# Altium PCB Smart-Button-PCB-v2.1.PcbDoc (part 1 of 2)
Units mm, origin at the board's own origin, x right, y up, seen from the top; angles counter-clockwise.
Board outline 90 x 83 mm, 2 copper layers (Top Layer, Bottom Layer), stack 1.17 mm thick; 43 components, 20 nets, 162 pads, 0 vias.
Unrouted connection lines stored in the file: 71.
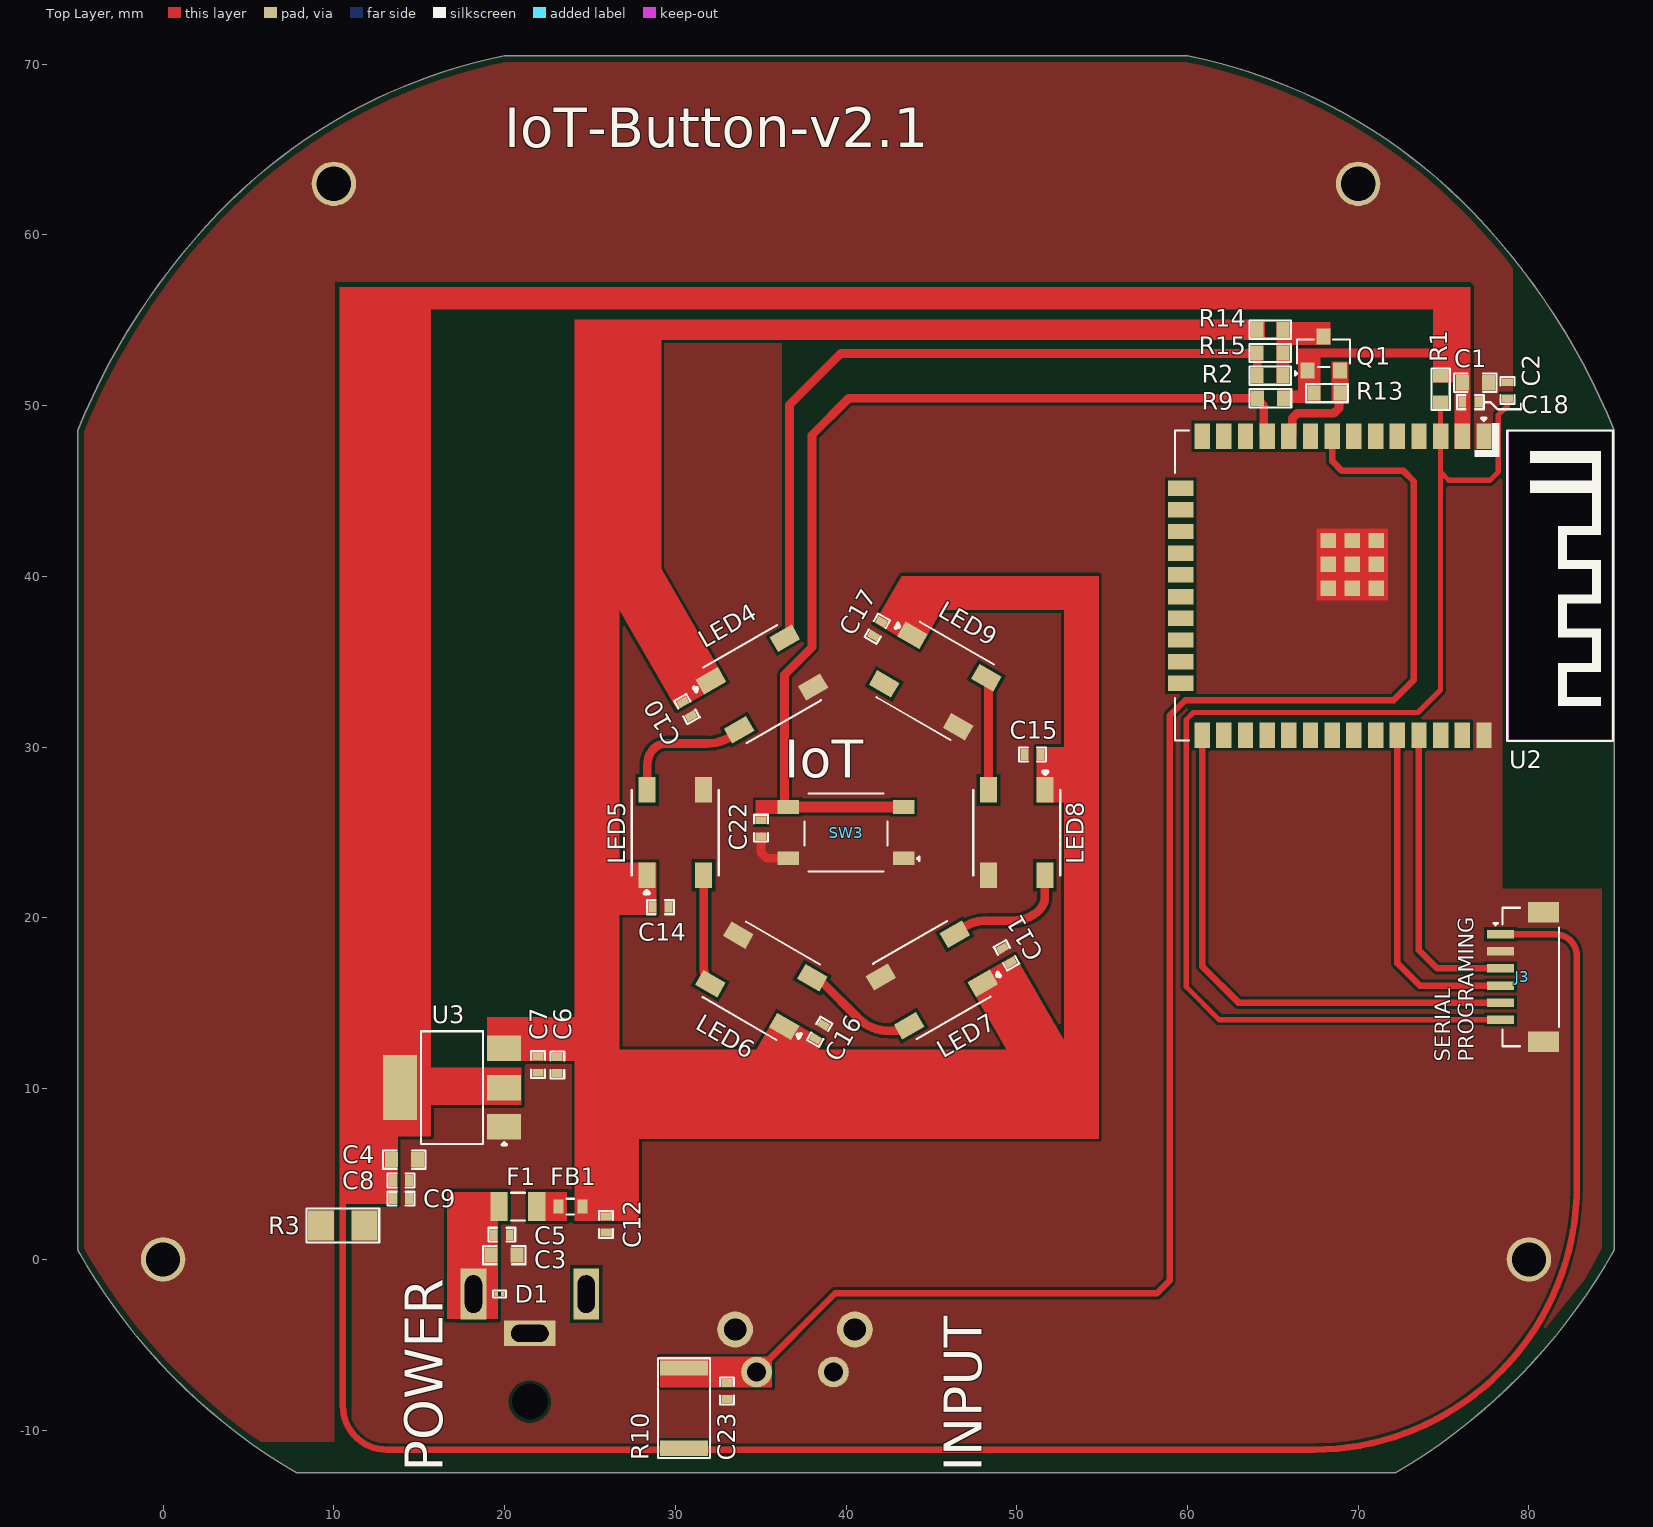
[diagram p0: Top Layer view]
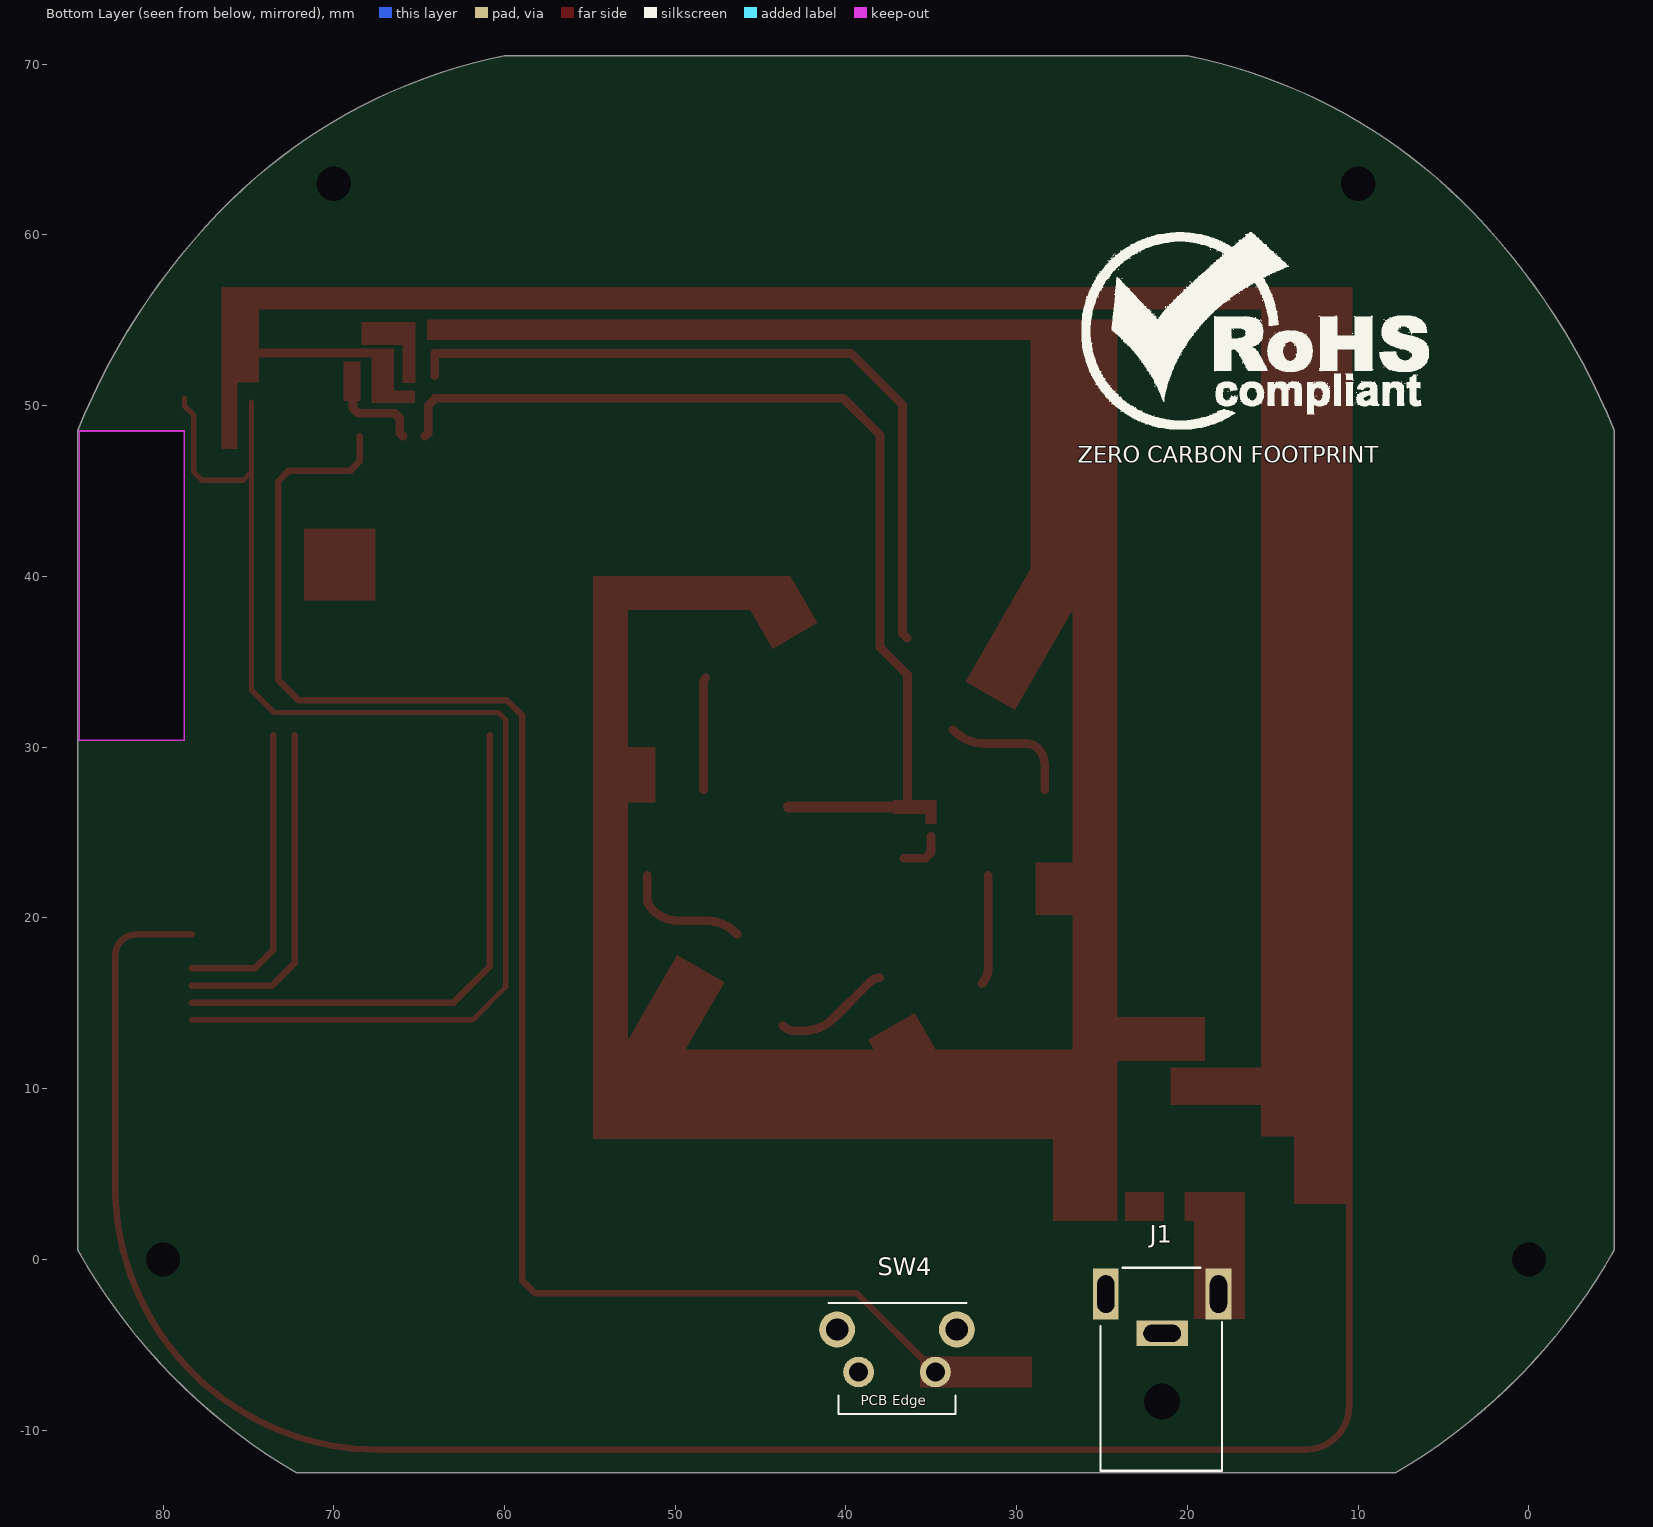
[diagram p1: Bottom Layer view, seen from below]
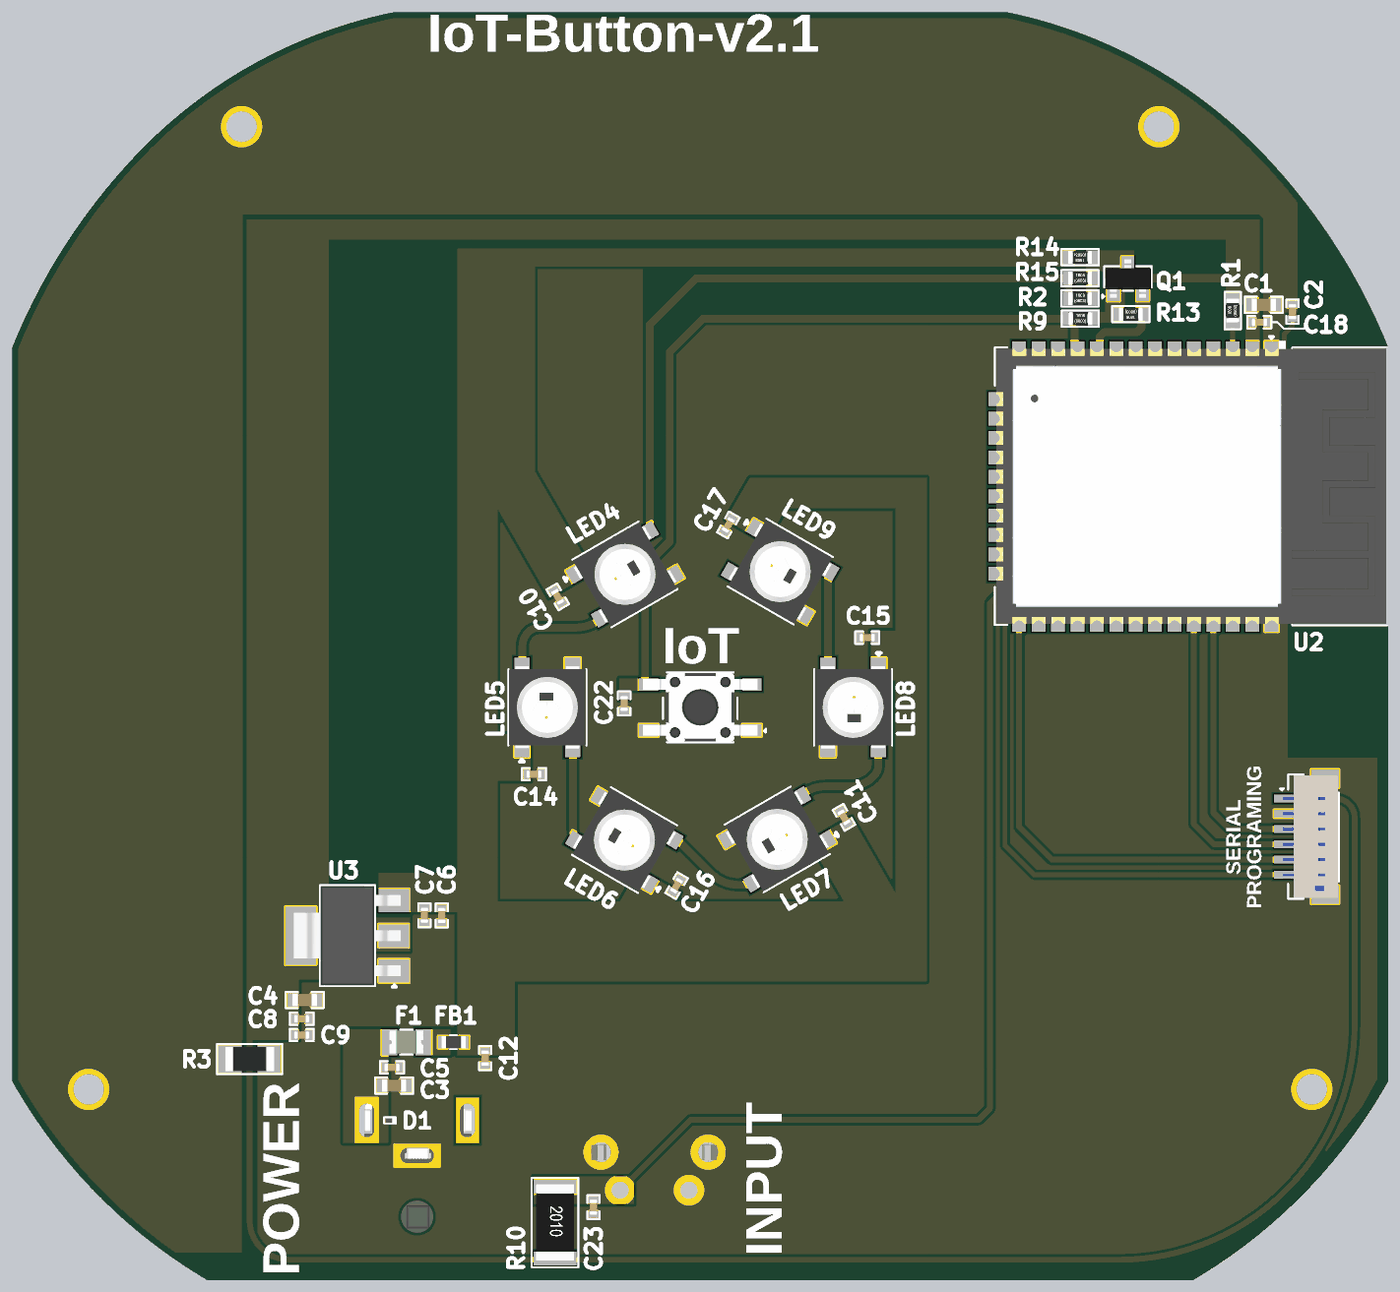
[diagram p2: 3D render of the assembled board from above, using the file's embedded part models]

## Layer stack, top to bottom
Top Solder: solder mask 0.01, Solder Resist, Dk 3.5
Top Layer: signal copper 0.035
Dielectric 1: dielectric 1.1, FR-4, Dk 4.8
Bottom Layer: signal copper 0.035
Bottom Solder: solder mask 0.01, Solder Resist, Dk 3.5

## Board outline
7.805,-12.5 cw(c25.512,17.69) -5,0.544 -5,48.544 cw(c32.1,33.591) 3.25,61.298 cw(c26.33,39.132) 20,70.5 60,70.5 cw(c53.67,39.132) 76.75,61.298 cw(c47.9,33.591) 85,48.544 85,0.544 cw(c54.488,17.69) 72.195,-12.5
cut-out: 78.74,30.397 78.74,48.533 85,48.544 85,30.411

## Design rules (kind name [scope] priority, off if disabled: settings)
BoardOutlineClearance [All] p1: gap=0 ignorepadtopadclearanceinfootprint=FALSE except(0.381: Poly-OutlineEdge)
Clearance [All] p1: gap=0.178 ignorepadtopadclearanceinfootprint=TRUE
HoleToHoleClearance [All] p1: gap=0.127 allowstackedmicrovias=TRUE
MinimumSolderMaskSliver [All] p1: minsoldermaskwidth=0
PolygonConnect [All] p1: connectstyle=Direct reliefconductorwidth=0.432 reliefentries=4 polygonreliefangle="90 Angle" airgapwidth=0.254
RoutingLayers [All] p1: top layer_v5=TRUE bottom layer_v5=FALSE
RoutingVias [All] p1: holewidth=0.3 width=0.6 viastyle="Through Hole" minholewidth=0.3 minwidth=0.6 maxholewidth=0.3 maxwidth=0.6
SilkToSilkClearance [All] p1: silktosilkclearance=0
SilkToSolderMaskClearance [IsPad] p1: minsilkscreentomaskgap=0 clearancetoexposedcopper=TRUE
SolderMaskExpansion [All] p1: expansion=0.102 istentingtop=FALSE
SupplyNets "Schematic Supply Nets_4" [InNet('D-GND')] p1: voltage=0.000
SupplyNets "Schematic Supply Nets_3" [InNet('5VIN')] p2: voltage=0.000
SupplyNets "Schematic Supply Nets_2" [InNet('3.3V')] p3: voltage=0.000
SupplyNets "Schematic Supply Nets_1" [InNet('5VCC')] p4: voltage=0.000
SupplyNets "Schematic Supply Nets" [InNet('GND')] p5: voltage=0.000
UnRoutedNet [All] p1: checkbadconnections=TRUE
Width [All] p1: maxlimit=1.2 minlimit=0.254 preferedwidth=0.508 minimp=50.000000 maximp=50.000000 favimp=50.000000
24 further rules are at their usual default settings.

## Classes and differential pairs
component class U_Power-Section: C3 C4 C5 C6 C7 C8 C9 C12 D1 F1 FB1 J1 U3
component class U_LEDS: C10 C11 C14 C15 C16 C17 LED4 LED5 LED6 LED7 LED8 LED9 Q1 R2 R13 R14 R15
component class U_Controller-Section: C1 C2 C18 C22 C23 J3 R1 R3 R9 R10 SW3 SW4 U2

## Components (designator, comment, footprint, x,y, rotation, side; value= is the part's Value field where it differs from the comment)
C1 "22uF" Cap-0603 76.86,51.346 r180 top
C2 "100nF" Cap-0402 78.74,50.902 r270 top
C3 "1uF" Cap-0603 19.977,0.247 r180 top
C4 "22uF" Cap-0603 14.133,5.845 r180 top
C5 "100nF" Cap-0402 19.84,1.446 r180 top
C6 "4.7uF" Cap-0402 23.089,11.379 r90 top
C7 "1uF" Cap-0402 21.958,11.4 r90 top
C8 "1uF" Cap-0402 13.937,4.616 r180 top
C9 "0.1uF" Cap-0402 13.937,3.556 r180 top
C10 "100nF" Cap-0402 30.683,32.233 r120 top
C11 "100nF" Cap-0402 49.403,17.805 r300 top
C12 "0.1uF" Cap-0402 25.933,2.045 r90 top
C14 "100nF" Cap-0402 29.129,20.625 r180 top locked
C15 "100nF" Cap-0402 50.926,29.566 r0 top
C16 "100nF" Cap-0402 38.456,13.335 r240 top
C17 "100nF" Cap-0402 41.837,36.936 r60 top
C18 "100nF" Cap-0402 76.568,50.203 r180 top
C22 "100nF" Cap-0402 35.025,25.254 r90 top
C23 "100nF" Cap-0402 33.02,-7.704 r90 top
D1 "PESD5V0H1BSFYL" DSN0603-2 19.707,-2.029 r180 top
F1 "BSMD0805L-200" Fuse-0805 20.785,3.092 r0 top
FB1 "BLM18SG121TN1D" "IND-0603 (1608 Metric)" 23.866,3.092 r180 top
J1 "DC-0360-2.5" DC-0360-2.5 21.481,-4.331 r90 bottom
J3 "Voltlink Target" "Voltlink Target" 79.598,16.539 r270 top
LED4 "WS2812B-XF02/W" WS2812B-XF02/W 35.078,33.705 r30 top
LED5 "WS2812B-XF02/W" WS2812B-XF02/W 30,25 r90 top locked
LED6 "WS2812B-XF02/W" WS2812B-XF02/W 35.041,16.316 r150 top
LED7 "WS2812B-XF02/W" WS2812B-XF02/W 45.033,16.359 r210 top
LED8 "WS2812B-XF02/W" WS2812B-XF02/W 50,25 r270 top locked
LED9 "WS2812B-XF02/W" WS2812B-XF02/W 45.227,33.882 r330 top
Q1 "Si2302CDS" Sot-23 67.974,53.057 r0 top
R1 "10K" Res-0603 74.828,50.965 r270 top
R2 "DNP" Res-0603 64.846,51.765 r180 top
R3 "0R" Res-1206 10.531,1.984 r0 top value=0mR
R9 "10K" Res-0603 64.858,50.438 r180 top
R10 "10K" RES-2010 30.505,-8.712 r270 top
R13 "10K" Res-0603 68.167,50.736 r0 top
R14 "10K" Res-0603 64.846,54.458 r0 top
R15 "1K" Res-0603 64.846,53.086 r180 top
SW3 "GT-TC074E-H080-L1" GT-TC074E-H080-L1 40,25 r180 top locked
SW4 "1825027-8" 1825027-8 37.013,-5.353 r180 bottom
U2 "ESP32-WROOM-32E-N8R2" "38-SMD Module" 68.488,39.459 r270 top
U3 "AMS1117-3.3" "SOT- 223" 16.916,10.058 r90 top

## Footprints (in the part's own frame and the unit in brackets; to place one, negate y for a bottom-side part, rotate by r counter-clockwise, add the part's x,y. Pads: shape width x height; smd on the part's side, far side on the other; paste and mask are expansions set on the pad)
"38-SMD Module" [mm]
  rect 1.5x0.9 smd: 1(-8.75,8.88) 2(-8.75,7.61) 3(-8.75,6.34) 4(-8.75,5.07) 5(-8.75,3.8) 6(-8.75,2.53) 7(-8.75,1.26) 8(-8.75,-0.01) 9(-8.75,-1.28) 10(-8.75,-2.55) 11(-8.75,-3.82) 12(-8.75,-5.09) 13(-8.75,-6.36) 14(-8.75,-7.63) 25(8.75,-7.63) 26(8.75,-6.36) 27(8.75,-5.09) 28(8.75,-3.82) 29(8.75,-2.55) 30(8.75,-1.28) 31(8.75,-0.01) 32(8.75,1.26) 33(8.75,2.53) 34(8.75,3.8) 35(8.75,5.07) 36(8.75,6.34) 37(8.75,7.61) 38(8.75,8.88)
  rect 0.9x1.5 smd: 15(-5.71,-8.88) 16(-4.44,-8.88) 17(-3.17,-8.88) 18(-1.9,-8.88) 19(-0.63,-8.88) 20(0.64,-8.88) 21(1.91,-8.88) 22(3.18,-8.88) 23(4.45,-8.88) 24(5.72,-8.88)
  rect 0.9x0.9 smd: 39(-2.65,2.56) 40(-1.25,2.56) 41(0.15,2.56) 42(-2.65,1.16) 43(-1.25,1.16) 44(0.15,1.16) 45(-2.65,-0.24) 46(-1.25,-0.24) 47(0.15,-0.24)
  Keep-Out Layer region: -9.043,10.287 9.042,10.287 9.042,16.383 -9.043,16.383
  silkscreen extent -9.8,-9.22 9.09,16.43, body extent -9,-9.12 9,16.38, height 3.25
1825027-8 [mm]
  round 1.8 hole 1.1: 1(-2.25,-1.245) 2(2.25,-1.245)
  round 2.1 hole 1.3: 3(3.505,1.245) 4(-3.505,1.245)
  silkscreen extent -4.01,-3.71 4.06,2.79, body extent -4.18,-7.11 4.23,2.73, height 8
Cap-0402 [mil]
  rect 18x25 smd mask+2.36: 1(-18.5,0) 2(18.5,0)
  silkscreen extent -31,-16 31,16, body extent -20,-10 20,10, height 19
Cap-0603 [mil]
  rect 30x35 smd mask+2.36: 1(-30,0) 2(30,0)
  silkscreen extent -49,-21 49,21, body extent -32,-16 31,16, height 34
DC-0360-2.5 [mm]
  rect 1.5x3 hole 1 slot 2.2 at 90 deg mask+0.05: 2(0,0)
  rect 3x1.5 hole 1 slot 2.2 at 0 deg mask+0.05: 3(2.3,3.3) 4(2.3,-3.3)
  round 0 hole 2.1 unplated mask+0.05: MH(-4,0)
  silkscreen extent -8.05,-3.51 3.84,3.61, body extent -8.01,-3.45 3.79,3.56, height 9.65
DSN0603-2 [mm]
  rect 0.2x0.24 smd mask+0.055: 1(-0.2,0) 2(0.2,0)
  silkscreen extent -0.38,-0.2 0.38,0.2, body extent -0.3,-0.15 0.3,0.15, height 0.32
Fuse-0805 [mm]
  rect 1x1.7 smd: 1(-1.1,0) 2(1.1,0)
  silkscreen extent -0.41,-0.81 0.41,0.81, body extent -1.1,-0.75 1.1,0.75, height 1.24
GT-TC074E-H080-L1 [mm]
  rect 1.25x0.8 smd: 1(-3.375,1.5) 2(3.375,1.5) 3(-3.375,-1.5) 4(3.375,-1.5)
  silkscreen extent -4.29,-2.29 2.44,2.29, body extent -3.75,-2.25 3.75,2.25, height 8
"IND-0603 (1608 Metric)" [mm] "0.063\" L x 0.032\" W (1.60mm x 0.80mm)"
  rect 0.6x0.8 smd: 1(-0.7,0) 2(0.7,0)
  silkscreen extent -0.2,-0.46 0.23,0.46, body extent -0.8,-0.4 0.8,0.4, height 0.78
Res-0603 [mil]
  rect 30x35 smd: 1(-30,0) 2(30,0)
  silkscreen extent -48,-21 48,21, body extent -31,-17 31,17, height 18
Res-1206 [mil]
  rect 60x70 smd: 1(-50,0) 2(50,0)
  silkscreen extent -84,-39 84,39, body extent -63,-31 63,31, height 24
RES-2010 [mm]
  rect 0.9x2.8 smd: 1(-2.35,0) 2(2.35,0)
  silkscreen extent -2.92,-1.52 2.92,1.52, body extent -2.5,-1.25 2.5,1.25, height 0.6
Sot-23 [mm] "TRANS NPN 40V 0.6A SOT23"
  rect 0.82x0.92 smd: 1(-0.95,-1) 2(0.95,-1) 3(0,1)
  silkscreen extent -1.68,-1.3 1.55,0.81, body extent -1.5,-1.25 1.5,1.25, height 1.05
"SOT- 223" [mm]
  rect 1.5x2 smd: 1(-2.3,-3.05) 2(0,-3.05) 3(2.3,-3.05)
  rect 3.8x2 smd: 4(0,3.05)
  silkscreen extent -3.35,-3.2 3.3,1.8, body extent -3.25,-3.5 3.25,3.5, height 1.61
"Voltlink Target" [mm]
  rect 0.5x1.6 smd: 1(-2.5,-1.262) 2(-1.5,-1.262) 3(-0.5,-1.262) 4(0.5,-1.262) 5(1.5,-1.262) 6(2.5,-1.262)
  rect 1.2x1.8 smd: MP1(-3.8,1.262) MP2(3.8,1.262)
  silkscreen extent -4.06,-1.68 4.06,2.17, body extent -4,-1.49 4,2.11, height 4.25
WS2812B-XF02/W [mm]
  rect 1.5x1 smd: 1(-2.5,1.65) 2(-2.5,-1.65) 3(2.5,-1.65) 4(2.5,1.65)
  silkscreen extent -3.56,-2.55 2.5,2.55, body extent -2.7,-2.5 2.7,2.5, height 1.55

## Part data
C1 C4: library part CL10A226MO7JZNC, "CAP CER 22UF 16V X5R 0603", Case Code (Imperial)=0603, Case Code (Metric)=1608, LCSC Part Number=C2762594, Manufacturer=Samsung, Max Operating Temperature=85°C, Min Operating Temperature=-55°C, Tolerance=20%, Voltage Rating=16V, Case/Package=0603, ComponentLink1Description=http://www.samsungsem.com/kr/support/product-search/mlcc/CL10A226MO7JZNC.jsp?src-supplier=Digikey, ComponentLink1URL=http://www.samsungsem.com/kr/support/product-search/mlcc/CL10A226MO7JZNC.jsp?src-supplier=Digikey, ComponentLink2Description=https://datasheet.octopart.com/CL10A226MO7JZNC-Samsung-Electro-Mechanics-datasheet-149156497.pdf?src-supplier=Future+Electronics, ComponentLink2URL=https://datasheet.octopart.com/CL10A226MO7JZNC-Samsung-Electro-Mechanics-datasheet-149156497.pdf?src-supplier=Future+Electronics, Height=900um, Item Type=Capacitors, Manufacturer Part Number=CL10A226MO7JZNC, Material=4241ConductorMaterial, Mounting Technology="Surface Mount", Packaging="Cut Tape", Pricing="1=0.65, 10=0.391, 50=0.2884, 100=0.2564, 500=0.20198, 1000=0.18499 (USD)", RoHS=Yes, RoHS Compliant=Yes, Series=CL, Stock=944984, Supplier=Digikey
C2 C5 C10 C11 C14 C15 C16 C17 C18 C22 C23: library part CC0402KRX5R8BB104, "CAP CER 0.1UF 25V X5R 0402", Case Code (Imperial)=0402, Case Code (Metric)=1005, Dielectric=X5R, LCSC Part Number=C106256, Manufacturer=Yageo, Max Operating Temperature=85°C, Min Operating Temperature=-55°C, Resistor Type=Ceramic, Supplier Part Number 1=311-1697-1-ND, Tolerance=10%, Voltage Rating=25V, Capacitance=100nF, Case/Package=0402, Category="Ceramic Capacitors", ComponentLink1Description=http://www.mouser.com/ds/2/447/UPY-GPHC_X5R_4V-to-50V_25-1131599.pdf?src-supplier=Mouser, ComponentLink1URL=http://www.mouser.com/ds/2/447/UPY-GPHC_X5R_4V-to-50V_25-1131599.pdf?src-supplier=Mouser, ComponentLink2Description=http://www.yageo.com/documents/recent/UPY-GPHC_X5R_4V-to-50V-16.pdf?src-supplier=Future+Electronics, ComponentLink2URL=http://www.yageo.com/documents/recent/UPY-GPHC_X5R_4V-to-50V-16.pdf?src-supplier=Future+Electronics, ComponentLink3Description=http://www.yageo.com/documents/recent/UPY-GPHC_X5R_4V-to-50V_25.pdf?src-supplier=Digi-Key, ComponentLink3URL=http://www.yageo.com/documents/recent/UPY-GPHC_X5R_4V-to-50V_25.pdf?src-supplier=Digi-Key, Depth=0.5mm, Halogen Free="Halogen Free", Item Type=Capacitor, Lead Free="Lead Free", Length=0.039inch, Manufacturer Part Number=CC0402KRX5R8BB104, Mount="Surface Mount", Packaging="Tape and Reel", Pricing 1="1=0.10000, 10=0.03800, 50=0.02100, 100=0.01710, 500=0.01224, 1000=0.00961, 2500=0.00874, 5000=0.00804 (USD)", RoHS=Yes, RoHS Compliant=Yes, Series=CC, Stock 1=4598218, Supplier 1=Digi-Key, Thickness=0.022inch, Voltage Rating (DC)=25V, Width=0.02inch
C3: library part CC0603KRX5R8BB105, "CAP CER 1UF 25V X5R 0603", Case Code (Imperial)=0603, Case Code (Metric)=1608, Dielectric=X5R, LCSC Part Number=C14664, Manufacturer=Yageo, Max Operating Temperature=85°C, Min Operating Temperature=-55°C, Package Quantity=1, Supplier Part Number 1=311-1445-1-ND, Tolerance=10%, Voltage Rating=25V, Capacitance=1uF, Case/Package=0603, Category="Ceramic Capacitors", ComponentLink1Description=https://datasheet.ciiva.com/176/mlccorderingcode-176785.pdf?src-supplier=Digi-Key, ComponentLink1URL=https://datasheet.ciiva.com/176/mlccorderingcode-176785.pdf?src-supplier=Digi-Key, ComponentLink2Description=https://datasheet.ciiva.com/176/mlccorderingcode-176786.pdf?src-supplier=Digi-Key, ComponentLink2URL=https://datasheet.ciiva.com/176/mlccorderingcode-176786.pdf?src-supplier=Digi-Key, ComponentLink3Description=https://datasheet.ciiva.com/176/mlccorderingcode-176787.pdf?src-supplier=Digi-Key, ComponentLink3URL=https://datasheet.ciiva.com/176/mlccorderingcode-176787.pdf?src-supplier=Digi-Key, ComponentLink4Description=https://datasheet.ciiva.com/17436/upy-gphc-x5r-4v-to-50v-12-17436952.pdf?src-supplier=Avnet+Europe, ComponentLink4URL=https://datasheet.ciiva.com/17436/upy-gphc-x5r-4v-to-50v-12-17436952.pdf?src-supplier=Avnet+Europe, ComponentLink5Description=https://datasheet.ciiva.com/7978/1525783-7978171.pdf?src-supplier=Element14, ComponentLink5URL=https://datasheet.ciiva.com/7978/1525783-7978171.pdf?src-supplier=Element14, ComponentLink6Description=https://datasheet.ciiva.com/11586/upy-gphc-x5r-4v-to-50v-12-11586318.pdf?src-supplier=Avnet, ComponentLink6URL=https://datasheet.ciiva.com/11586/upy-gphc-x5r-4v-to-50v-12-11586318.pdf?src-supplier=Avnet, Construction=Flat, Depth=0.8mm, Halogen Free="Halogen Free", Height=0.8mm, Item Type=Capacitor, Lead Free="Lead Free", Length=1.6mm, Manufacturer Part Number=CC0603KRX5R8BB105, Mount="Surface Mount", Number of Pins=2, Packaging="Tape and Reel", Pricing 1="1=0.12000, 10=0.08400, 50=0.04760, 100=0.03940, 500=0.02764, 1000=0.02288 (USD)", Radiation Hardening=No, REACH SVHC="No SVHC", RoHS=Yes, RoHS Compliant=Yes, Series=CC, Stock 1=919939, Supplier 1=Digi-Key, Termination=SMD/SMT, Thickness=0.035inch, Voltage Rating (DC)=25V, Width=0.031inch
C6: library part CC0402KRX5R6BB475, "CAP CER 4.7UF 10V X5R 0402", Case Code (Imperial)=0402, Case Code (Metric)=1005, LCSC Part Number=C326586, Manufacturer=Yageo, Max Operating Temperature=85°C, Min Operating Temperature=-55°C, Supplier Part Number 1=3871698, Tolerance=10%, Voltage Rating=10V, Capacitance=4.7uF, Case/Package=0402, Category="Ceramic Capacitors", ComponentLink1Description=http://www.yageo.com/documents/recent/UPY-GPHC_X5R_4V-to-50V_25.pdf?src-supplier=Digi-Key, ComponentLink1URL=http://www.yageo.com/documents/recent/UPY-GPHC_X5R_4V-to-50V_25.pdf?src-supplier=Digi-Key, Manufacturer Part Number=CC0402KRX5R6BB475, Mount="Surface Mount", Packaging="Cut Tape", Pricing 1="10000=0.02310, 50000=0.02100 (GBP)", RoHS=Yes, RoHS Compliant=Yes, Stock 1=20000, Supplier 1=Farnell
C7 C8: library part CC0402KRX5R7BB105, "CAP CER 1UF 16V X5R 0402", Case Code (Imperial)=0402, Case Code (Metric)=1005, Dielectric=X5R, LCSC Part Number=C325464, Manufacturer=Yageo, Max Operating Temperature=85°C, Min Operating Temperature=-55°C, Supplier Part Number 1=311-1691-6-ND, Tolerance=10%, Voltage Rating=16V, Capacitance=1uF, Case/Package=0402, ComponentLink1Description=http://www.yageo.com/documents/recent/UPY-GPHC_X5R_4V-to-50V_12.pdf?src-supplier=Avnet+Europe, ComponentLink1URL=http://www.yageo.com/documents/recent/UPY-GPHC_X5R_4V-to-50V_12.pdf?src-supplier=Avnet+Europe, Composition=Ceramic, Depth=0.5mm, Halogen Free="Halogen Free", Height=0.5mm, Item Type=Capacitor, Lead Free="Lead Free", Length=1mm, Manufacturer Part Number=CC0402KRX5R7BB105, Mount="Surface Mount", Packaging="Tape and Reel", Pricing 1="1=0.36, 10=0.252, 100=0.1512, 500=0.1134, 1000=0.09576, 2500=0.09072, 5000=0.08568 (USD)", Radiation Hardening=No, Stock 1=1405667, Supplier 1=Digi-Key, Termination=SMD/SMT, Thickness=0.022inch, Voltage Rating (DC)=16V, Weight=2.3E-05oz, Width=0.02inch
C9 C12: library part CL05B104KB54PNC, "CAP CER 0.1UF 50V X7R 0402", LCSC Part Number=C307331, Manufacturer=Samsung, Supplier Part Number 1=1276-CL05B104KB54PNCDKR-ND, Manufacturer Part Number=CL05B104KB54PNC, Pricing 1="1=0.1, 10=0.067, 50=0.0366, 100=0.0299, 500=0.02138, 1000=0.01681, 2500=0.01528, 5000=0.01406 (USD)", Stock 1=8594, Supplier 1=Digi-Key
D1: "TVS DIODE 5VWM 6.3VC DSN0603-2", LCSC Part Number=C477989, Manufacturer=Nexperia, Category="ESD and Circuit Protection ICs", ComponentLink1Description=http://www.farnell.com/datasheets/1961312.pdf?src-supplier=Farnell, ComponentLink1URL=http://www.farnell.com/datasheets/1961312.pdf?src-supplier=Farnell, ComponentLink2Description=https://assets.nexperia.com/documents/data-sheet/PESD5V0H1BSF.pdf?src-supplier=Digi-Key, ComponentLink2URL=https://assets.nexperia.com/documents/data-sheet/PESD5V0H1BSF.pdf?src-supplier=Digi-Key, ComponentLink3Description=http://www.farnell.com/datasheets/1961312.pdf?src-supplier=Newark, ComponentLink3URL=http://www.farnell.com/datasheets/1961312.pdf?src-supplier=Newark, Item Type=Diode, Manufacturer Part Number=PESD5V0H1BSFYL, Pricing 1="18000=0.06453, 36000=0.06278, 54000=0.06104, 90000=0.05930, 180000=0.05755, 900000=0.05581, 1800000=0.05406 (USD)", RoHS=Yes, RoHS Compliant=Yes, Stock 1=9000, Supplier 1=Avnet, Supplier Part Number 1=PESD5V0H1BSFYL
F1: "6V 2A 50A 1W -40℃~+85℃ 4A 4mΩ 5s 45mΩ 0805 Resettable Fuses ROHS", LCSC Part Number=C2757931, Manufacturer=BHFUSE, Package=0805, ComponentLink1Description=LCSC, ComponentLink1URL=https://www.lcsc.com/product-detail/Resettable-Fuses_BHFUSE-BSMD0805L-200_C2757931.html, Item Type=Fuse, Manufacturer Part Number=BSMD0805L-200
FB1: "FERRITE BEAD 120 OHM 0603 1LN", Case Code (Imperial)=0603, Case Code (Metric)=1608, Current Rating=3A, DC Resistance (DCR)=25mR, Frequency=100MHz, LCSC Part Number=C113030, Manufacturer=Murata, Max Operating Temperature=125°C, Min Operating Temperature=-55°C, Package Quantity=1, Tolerance=25%, Case/Package=0603, Category="Ferrite Beads and Chips", ComponentLink1Description=https://datasheet.ciiva.com/1012/l0110s0100blm18s-1012624.pdf?src-supplier=Digi-Key, ComponentLink1URL=https://datasheet.ciiva.com/1012/l0110s0100blm18s-1012624.pdf?src-supplier=Digi-Key, ComponentLink2Description=https://datasheet.ciiva.com/11799/0900766b811b5866-11799181.pdf?src-supplier=RSComponents, ComponentLink2URL=https://datasheet.ciiva.com/11799/0900766b811b5866-11799181.pdf?src-supplier=RSComponents, ComponentLink3Description=https://datasheet.ciiva.com/18093/getdatasheetpartid-295885-18093249.pdf?src-supplier=Verical, ComponentLink3URL=https://datasheet.ciiva.com/18093/getdatasheetpartid-295885-18093249.pdf?src-supplier=Verical, ComponentLink4Description=https://datasheet.ciiva.com/41449/001171723-da-01-en-chip-drossel0603-120r-3000ma-1-6x0-8mm-41449353.pdf?src-supplier=Conrad, ComponentLink4URL=https://datasheet.ciiva.com/41449/001171723-da-01-en-chip-drossel0603-120r-3000ma-1-6x0-8mm-41449353.pdf?src-supplier=Conrad, ComponentLink5Description=https://datasheet.ciiva.com/41449/001172312-da-01-en-drossel-0603-120r-1-6x0-8mm-10000st-41449675.pdf?src-supplier=Conrad, ComponentLink5URL=https://datasheet.ciiva.com/41449/001172312-da-01-en-drossel-0603-120r-1-6x0-8mm-10000st-41449675.pdf?src-supplier=Conrad, ComponentLink6Description=https://datasheet.ciiva.com/8021/5151-8021511.pdf?src-supplier=Element14, ComponentLink6URL=https://datasheet.ciiva.com/8021/5151-8021511.pdf?src-supplier=Element14, ComponentLink7Description=https://datasheet.ciiva.com/8021/5151-8021512.pdf?src-supplier=Element14, ComponentLink7URL=https://datasheet.ciiva.com/8021/5151-8021512.pdf?src-supplier=Element14, ComponentLink8Description=https://datasheet.ciiva.com/14122/blm-series-eng-tds-14122906.pdf?src-supplier=Distrelec, ComponentLink8URL=https://datasheet.ciiva.com/14122/blm-series-eng-tds-14122906.pdf?src-supplier=Distrelec, ComponentLink9Description=https://datasheet.ciiva.com/1012/l0110s0100blm18s-1012623.pdf?src-supplier=Digi-Key, ComponentLink9URL=https://datasheet.ciiva.com/1012/l0110s0100blm18s-1012623.pdf?src-supplier=Digi-Key, ComponentLink10Description=https://datasheet.ciiva.com/1012/l0110s0100blm18s-1012625.pdf?src-supplier=Digi-Key, ComponentLink10URL=https://datasheet.ciiva.com/1012/l0110s0100blm18s-1012625.pdf?src-supplier=Digi-Key, ComponentLink11Description=https://datasheet.ciiva.com/16395/l0110s0100blm18s-16395498.pdf?src-supplier=Future+Electronics, ComponentLink11URL=https://datasheet.ciiva.com/16395/l0110s0100blm18s-16395498.pdf?src-supplier=Future+Electronics, Core Material=Ferrite, DC Resistance-Max=25mR, Depth=0.8mm, Height=0.8mm, Impedance=120R, Item Type="Ferrite Bead", Lead Free="Lead Free", Length=1.6mm, Manufacturer Part Number=BLM18SG121TN1D, Material=Steel,Ferrite, Max Current Rating=3A, Max DC Current=3A, Number of Circuits=1, Number of Lines=1, Number of Pins=2, Packaging="Tape and Reel", Pricing 1="1=0.12640, 10=0.08350, 25=0.07210, 100=0.05150, 250=0.04730, 500=0.04110, 1000=0.03420, 3000=0.03360, 6000=0.03320, 15000=0.03270, 30000=0.03200, 75000=0.03150 (USD)", Reach SVHC Compliant=Yes, RoHS=Yes, RoHS Compliant=Yes, Series=BLM18S, Shielding=Unshielded, Stock 1=82612, Supplier 1="Arrow Electronics", Supplier Part Number 1=BLM18SG121TN1D, Termination=SMD/SMT, Test Frequency=100MHz, Width=0.8mm
J1: "DC Power Receptacle 260℃ Brass -20℃~+70℃ 2.5mm 6mm 2.5A 24V Plugin AC/DC Power Connectors ROHS", LCSC Part Number=C319122, Manufacturer="XKB Connectivity", Package=Plugin, ComponentLink1Description=LCSC, ComponentLink1URL=https://www.lcsc.com/product-detail/AC-DC-Power-Connectors_XKB-Connectivity-DC-0360-2-5_C319122.html, Item Type="DC Jack", Manufacturer Part Number=DC-0360-2.5
J3: library part C145963, "1x6P SH 1 1mm 6 SMD,P=1mm Wire To Board / Wire To Wire Connector ROHS", Manufacturer=BOOMELE, Package=SMD,P=1mm, ComponentLink1Description=LCSC, ComponentLink1URL=https://www.lcsc.com/product-detail/Wire-To-Board-Wire-To-Wire-Connector_BOOMELE-Boom-Precision-Elec-C145963_C145963.html, Item Type=Connector, LCSC Part Number=C145963, Manufacturer Part Number=C145963
LED4 LED5 LED6 LED7 LED8 LED9: "SMD5050 Light Emitting Diodes (LED) ROHS", LCSC Part Number=C4154882, Manufacturer=Worldsemi, Package=SMD5050, ComponentLink1Description=LCSC, ComponentLink1URL=https://www.lcsc.com/product-detail/Light-Emitting-Diodes-LED_Worldsemi-WS2812B-XF02-W_C4154882.html, Item Type="RGB LED", Manufacturer Part Number=WS2812B-XF02/W
Q1: "N-CHANNEL 20-V (D-S) MOSFET", LCSC Part Number=C5310968, Manufacturer="TECH PUBLIC", Manufacturer Part Number=SI2302CDS, Package=SOT-23, ComponentLink1Description=LCSC, ComponentLink1URL=https://www.lcsc.com/product-detail/MOSFETs_TECH-PUBLIC-SI2302CDS_C5310968.html, Item Type=Mosfet
R1 R9 R13 R14: library part RC0603FR-0710KL, "RES SMD 10K Ohm 1% 1/10W 0603", Case Code (Imperial)=0603, Case Code (Metric)=1608, LCSC Part Number=C98220, Manufacturer=Yageo, Max Operating Temperature=155°C, Max Power Dissipation=100mW, Min Operating Temperature=-55°C, Resistance=10kR, Resistance Tolerance=1%, Resistor Type="Thick Film", Supplier Part Number 1=311-10.0KHRCT-ND, Temperature Coefficient=100ppm/°C, Voltage Rating=75V, Voltage Rating (DC)=50V, Case/Package=0603, Category="Chip SMD Resistors", ComponentLink1Description=https://datasheet.ciiva.com/7660/38590-7660789.pdf?src-supplier=Element14, ComponentLink1URL=https://datasheet.ciiva.com/7660/38590-7660789.pdf?src-supplier=Element14, ComponentLink2Description=https://datasheet.ciiva.com/7983/443971-7983596.pdf?src-supplier=Element14, ComponentLink2URL=https://datasheet.ciiva.com/7983/443971-7983596.pdf?src-supplier=Element14, ComponentLink3Description=https://datasheet.ciiva.com/22747/443971-22747519.pdf?src-supplier=Element14, ComponentLink3URL=https://datasheet.ciiva.com/22747/443971-22747519.pdf?src-supplier=Element14, ComponentLink4Description=https://datasheet.ciiva.com/46440/1868787-46440891.pdf?src-supplier=Element14, ComponentLink4URL=https://datasheet.ciiva.com/46440/1868787-46440891.pdf?src-supplier=Element14, ComponentLink5Description=https://datasheet.ciiva.com/7746/1738695-7746239.pdf?src-supplier=Element14, ComponentLink5URL=https://datasheet.ciiva.com/7746/1738695-7746239.pdf?src-supplier=Element14, ComponentLink6Description=https://datasheet.ciiva.com/15189/getdatasheetpartid-409289-15189591.pdf?src-supplier=Verical, ComponentLink6URL=https://datasheet.ciiva.com/15189/getdatasheetpartid-409289-15189591.pdf?src-supplier=Verical, Construction=Rectangular, Depth=0.8mm, Features="Moisture Resistant", Height=0.45mm, Item Type=Resistor, Lead Free="Lead Free", Lead Pitch=0.3mm, Length=1.6mm, Manufacturer Part Number=RC0603FR-0710KL, Military Standard=Not, Number of Pins=2, Number of Terminations=2, Packaging="Tape and Reel", Power Rating=100mW, Pricing 1="1=0.10000, 10=0.02400, 100=0.00970, 1000=0.00436, 2500=0.00378 (USD)", REACH SVHC=Unknown, RoHS=Yes, RoHS Compliant=Yes, Series=RC, Size Code=0603, Stock 1=25249139, Supplier 1=Digi-Key, Termination=SMD/SMT, Tolerance=1%, Weight=7.1E-05oz, Width=0.8mm
R2: library part RC0603JR-070RL, "RES 0 OHM JUMPER 1/10W 0603", Case Code (Imperial)=0603, Case Code (Metric)=1608, LCSC Part Number=C95177, Manufacturer=Yageo, Max Operating Temperature=155°C, Max Power Dissipation=100mW, Min Operating Temperature=-55°C, Package Quantity=5000, Resistance=0mR, Resistance Tolerance=5%, Resistor Type="Thick Film", Supplier Part Number 1=311-0.0GRCT-ND, Temperature Coefficient=200ppm/°C, Tolerance=1%, Voltage Rating=50V, Case/Package=0603, Category="Chip SMD Resistors", Construction=Rectangular, Contact Plating=Tin,Matte, Depth=0.8mm, Features="Moisture Resistant", Height=0.45mm, Item Type=Resistor, Lead Free="Lead Free", Length=1.6mm, Manufacturer Part Number=RC0603JR-070RL, Military Standard=Not, Number of Pins=2, Number of Terminations=2, Packaging="Tape and Reel", Power Rating=100mW, Pricing 1="1=0.10000, 10=0.01700, 25=0.01240, 50=0.00960, 100=0.00700, 250=0.00536, 500=0.00430, 1000=0.00316 (USD)", Radiation Hardening=No, Reach SVHC Compliant="No SVHC", RoHS=Yes, RoHS Compliant=Yes, Series=RC, Size Code=0603, Stock 1=18081776, Supplier 1=Digi-Key, Technology="THICK FILM", Termination=SMD/SMT, Voltage Rating (DC)=50V, Width=0.8mm
R3: library part RC1206JR-070RL, "RES 0 OHM JUMPER 1/4W 1206", Case Code (Imperial)=1206, Case Code (Metric)=3216, Manufacturer=Yageo, Max Operating Temperature=155°C, Max Power Dissipation=250mW, Min Operating Temperature=-55°C, Package Quantity=1, Resistance Tolerance=5%, Resistor Type="Thick Film,Carbon Film", Supplier Part Number=1414689, Temperature Coefficient=200ppm/°C, Voltage Rating=200V, Case/Package=1206, ComponentLink1Description=https://datasheet.ciiva.com/11808/0900766b80c6630a-11808156.pdf?src-supplier=Rs, ComponentLink1URL=https://datasheet.ciiva.com/11808/0900766b80c6630a-11808156.pdf?src-supplier=Rs, ComponentLink2Description=https://datasheet.ciiva.com/29181/402222-da-01-en-smd-widerstand-0-ohm-1206-29181568.pdf?src-supplier=Conrad, ComponentLink2URL=https://datasheet.ciiva.com/29181/402222-da-01-en-smd-widerstand-0-ohm-1206-29181568.pdf?src-supplier=Conrad, ComponentLink3Description=https://datasheet.ciiva.com/7983/444357-7983807.pdf?src-supplier=Element14, ComponentLink3URL=https://datasheet.ciiva.com/7983/444357-7983807.pdf?src-supplier=Element14, ComponentLink4Description=https://datasheet.ciiva.com/22747/1692832-22747541.pdf?src-supplier=Element14, ComponentLink4URL=https://datasheet.ciiva.com/22747/1692832-22747541.pdf?src-supplier=Element14, ComponentLink5Description=https://datasheet.ciiva.com/46445/444357-46445719.pdf?src-supplier=Element14, ComponentLink5URL=https://datasheet.ciiva.com/46445/444357-46445719.pdf?src-supplier=Element14, ComponentLink6Description=https://datasheet.ciiva.com/2458/pyu-rc1206-51-rohs-l-4-2458669.pdf?src-supplier=Digikey, ComponentLink6URL=https://datasheet.ciiva.com/2458/pyu-rc1206-51-rohs-l-4-2458669.pdf?src-supplier=Digikey, ComponentLink7Description=https://datasheet.ciiva.com/2458/pyu-rc1206-51-rohs-l-4-2458670.pdf?src-supplier=Digikey, ComponentLink7URL=https://datasheet.ciiva.com/2458/pyu-rc1206-51-rohs-l-4-2458670.pdf?src-supplier=Digikey, ComponentLink8Description=https://datasheet.ciiva.com/2458/pyu-rc1206-51-rohs-l-4-2458668.pdf?src-supplier=Digikey, ComponentLink8URL=https://datasheet.ciiva.com/2458/pyu-rc1206-51-rohs-l-4-2458668.pdf?src-supplier=Digikey, ComponentLink9Description=https://datasheet.ciiva.com/7857/1692832-7857422.pdf?src-supplier=Element14, ComponentLink9URL=https://datasheet.ciiva.com/7857/1692832-7857422.pdf?src-supplier=Element14, ComponentLink10Description=https://datasheet.ciiva.com/7857/1692832-7857421.pdf?src-supplier=Element14, ComponentLink10URL=https://datasheet.ciiva.com/7857/1692832-7857421.pdf?src-supplier=Element14, ComponentLink11Description=https://datasheet.ciiva.com/17035/pyu-rc1206-51-rohs-l-4-17035512.pdf?src-supplier=Future+Electronics, ComponentLink11URL=https://datasheet.ciiva.com/17035/pyu-rc1206-51-rohs-l-4-17035512.pdf?src-supplier=Future+Electronics, Contact Plating=Tin,Matte, Depth=1.6mm, Features="Moisture Resistant", Height=0.026inch, Item Type=Resistors, Lead Free=5697LeadFree, Length=0.122inch, Manufacturer Part Number=RC1206JR-070RL, Number of Terminations=2, Packaging="Tape and Reel", Power Rating=250mW, Pricing="5000=0.0025, 15000=0.0039, 25000=0.0023, 50000=0.0037, 100000=0.0022, 200000=0.0035, 250000=0.0021, 625000=0.002 (USD)", Reach SVHC Compliant=Unknown, RoHS=Yes, RoHS Compliant=Yes, Series=RC, Stock=1115000, Supplier="Future Electronics", Technology="THICK FILM", Termination=SMD/SMT, Tolerance=5%, Width=0.063inch
R10: library part RC2010FK-0710KL, "SMD Chip Resistor, 10 kOhm, ± 1%, 750 mW, 2010 [5025 Metric], Thick Film, General Purpose", Manufacturer=Yageo, Supplier Part Number=603-RC2010FK-0710KL, Category="Chip SMD Resistors", ComponentLink1Description=https://datasheet.ciiva.com/12668/pyu-rc2010-51-rohs-l-4-12668253.pdf?src-supplier=Mouser, ComponentLink1URL=https://datasheet.ciiva.com/12668/pyu-rc2010-51-rohs-l-4-12668253.pdf?src-supplier=Mouser, ComponentLink2Description=https://datasheet.ciiva.com/7672/1563630-7672311.pdf?src-supplier=Element14, ComponentLink2URL=https://datasheet.ciiva.com/7672/1563630-7672311.pdf?src-supplier=Element14, ComponentLink3Description=https://datasheet.ciiva.com/7672/1563630-7672312.pdf?src-supplier=Element14, ComponentLink3URL=https://datasheet.ciiva.com/7672/1563630-7672312.pdf?src-supplier=Element14, Manufacturer Part Number=RC2010FK-0710KL, Pricing="1=0.12, 10=0.065, 50=0.065, 100=0.054, 1000=0.043, 10000=0.024 (USD)", RoHS=Yes, Stock=3614, Supplier=Mouser
R15: library part RC0603FR-071KL, "RES SMD 1K OHM 1% 1/10W 0603", Case Code (Imperial)=0603, Case Code (Metric)=1608, LCSC Part Number=C22548, Manufacturer=Yageo, Max Operating Temperature=155°C, Min Operating Temperature=-55°C, Power Rating=100mW, Resistance=1kR, Supplier Part Number 1=311-1.00KHRDKR-ND, Temperature Coefficient=100ppm/°C, Tolerance=1%, Voltage Rating=50V, Case/Package=0603, ComponentLink1Description=https://www.verical.com/server-webapp/html/getDatasheet?partID=409289&src-supplier=Verical, ComponentLink1URL=https://www.verical.com/server-webapp/html/getDatasheet?partID=409289&src-supplier=Verical, ComponentLink2Description=http://documents.rs-components.com/techlib://itc_doclist_GB.htm?stockno=5048928&src-supplier=RSComponents, ComponentLink2URL=http://documents.rs-components.com/techlib://itc_doclist_GB.htm?stockno=5048928&src-supplier=RSComponents, ComponentLink3Description=http://www.yageo.com/documents/recent/PYu-RC0603_51_RoHS_L_4.pdf?src-supplier=Avnet+Europe, ComponentLink3URL=http://www.yageo.com/documents/recent/PYu-RC0603_51_RoHS_L_4.pdf?src-supplier=Avnet+Europe, ComponentLink4Description=http://www.farnell.com/datasheets/2167052.pdf?src-supplier=Element14, ComponentLink4URL=http://www.farnell.com/datasheets/2167052.pdf?src-supplier=Element14, ComponentLink5Description=http://www.farnell.com/datasheets/1868787.pdf?src-supplier=Element14, ComponentLink5URL=http://www.farnell.com/datasheets/1868787.pdf?src-supplier=Element14, ComponentLink6Description=http://www.yageo.com/documents/recent/PYu-RC_Group_51_RoHS_L_2.pdf?src-supplier=Avnet, ComponentLink6URL=http://www.yageo.com/documents/recent/PYu-RC_Group_51_RoHS_L_2.pdf?src-supplier=Avnet, ComponentLink7Description=https://www.verical.com/server-webapp/html/getDatasheet?partID=404327&src-supplier=Verical, ComponentLink7URL=https://www.verical.com/server-webapp/html/getDatasheet?partID=404327&src-supplier=Verical, ComponentLink8Description=http://www.farnell.com/datasheets/443971.pdf?src-supplier=Element14, ComponentLink8URL=http://www.farnell.com/datasheets/443971.pdf?src-supplier=Element14, Composition="Thick Film", Contact Plating=Tin,Matte, Depth=0.8mm, Height=0.45mm, Item Type=Resistor, Lead Free="Lead Free", Length=1.6mm, Manufacturer Part Number=RC0603FR-071KL, Military Standard=Not, Packaging="Tape and Reel", Pricing 1="1=0.1, 10=0.023, 100=0.0094, 1000=0.0042, 2500=0.0037 (USD)", Radiation Hardening=No, REACH SVHC="No SVHC", Stock 1=21472395, Supplier 1=Digi-Key, Termination=SMD/SMT
SW3: "No NO 50mA 100MΩ 100000 Times 12V 130gf@±30gf Brick nogging SPST SMD Tactile Switches ROHS", LCSC Part Number=C963229, Manufacturer=G-Switch, Package=SMD, ComponentLink1Description=LCSC, ComponentLink1URL=https://www.lcsc.com/product-detail/Tactile-Switches_G-Switch-GT-TC074E-H080-L1_C963229.html, Item Type="Tactile Switch", Manufacturer Part Number=GT-TC074E-H080-L1
SW4: "50mA Lying SPST 24V Plugin Tactile Switches ROHS", Manufacturer="TE Connectivity", Category="Pushbutton Switches", ComponentLink1Description=https://datasheet.ciiva.com/30072/eng-cd-1825027-f-30072833.pdf?src-supplier=Onlinecomponents.com, ComponentLink1URL=https://datasheet.ciiva.com/30072/eng-cd-1825027-f-30072833.pdf?src-supplier=Onlinecomponents.com, ComponentLink2Description=https://datasheet.ciiva.com/16393/1825027-8-16393346.pdf?src-supplier=Future+Electronics, ComponentLink2URL=https://datasheet.ciiva.com/16393/1825027-8-16393346.pdf?src-supplier=Future+Electronics, ComponentLink3Description=https://datasheet.ciiva.com/8164/eng-cd-1825027-g4-8164921.pdf?src-supplier=Avnet, ComponentLink3URL=https://datasheet.ciiva.com/8164/eng-cd-1825027-g4-8164921.pdf?src-supplier=Avnet, Manufacturer Part Number=1825027-8, Pricing 1="1=0.13800, 10=0.13370, 25=0.12590, 100=0.10940, 250=0.10570, 500=0.09520, 1000=0.07320, 2500=0.07250, 5000=0.06250 (USD)", RoHS=Yes, Stock 1=178529, Supplier 1="Arrow Electronics", Supplier Part Number 1=1825027-8
U2: "RF TXRX MODULE BT PCB TRACE SMD", LCSC Part Number=C5361945, Manufacturer="Espressif Systems", Supplier Part Number=1965-ESP32-WROOM-32E-N8R2DKR-ND, Category=Uncategorized, Item Type=Module, Manufacturer Part Number=ESP32-WROOM-32E-N8R2, Pricing="1=2.88 (USD)", RoHS=No, Supplier=Digikey
U3: "SOT-223 Linear Voltage Regulators (LDO) ROHS", LCSC Part Number=C2992570, Manufacturer="GUOXIN JIAPIN SEMICONDUCTOR", Package=SOT-223, ComponentLink1Description=LCSC, ComponentLink1URL=https://www.lcsc.com/product-detail/Linear-Voltage-Regulators-LDO_GUOXIN-JIAPIN-SEMICONDUCTOR-AMS1117-3-3_C2992570.html, Item Type=IC, Manufacturer Part Number=AMS1117-3.3

## Free pads (board coordinates)
  round 2.6 / inner round 2.6 / far side round 0 hole 2 mask+0.05: MH(0,0) MH(10,63) MH(70,63) MH(80,0)

## Nets (pads, with @x,y where several pads share a name; then routed paths per layer and width w, separated by ;. In a path a pad name is that pad's centre, name@x,y a point inside that pad or via, vN(x,y) a via of type N, cw(c..) or ccw(c..) an arc to the next point about the centre after c; other vN are vias at no path point)
3.3V: C1.2 C4.2 C8.2 C9.2 C18.2 J3.1 Q1.1 R1.1 R9.1 R10.2 R13.1 U2.2 U3.2 U3.4 | length 137.3
  Top Layer w0.381: 11.074,5.207 10.529,4.661 10.529,-8.573 ccw(c13.106,-8.573) 13.106,-11.151 30.505,-11.151 67.437,-11.151 ccw(c67.373,4.281) 82.804,4.345 82.804,17.786 ccw(c81.551,17.786) 81.551,19.039 J3.1 ; 12.294,30.08 12.294,10.126 12.361,10.058
  Top Layer w0.508: U2.2 C18.2
5VCC: C6.2 C7.2 C10.2 C11.2 C12.2 C14.2 C15.2 C16.2 C17.2 FB1.1 LED4.1 LED5.1 LED6.1 LED7.1 LED8.1 LED9.1 R14.1 U3.3 | length 0.1
  Top Layer w0.508: 53.873,21.387 53.975,21.285
5VIN: C3.2 C5.2 D1.2 F1.1 J1.4
BUTTON: C23.2 R10.1 SW4.2 U2.8 | length 93
  Top Layer w0.381: SW4.2 39.375,-1.986 58.215,-1.986 58.949,-1.252 58.949,31.838 59.865,32.754 72.073,32.754 73.254,33.934 73.254,45.576 72.648,46.181 69.052,46.181 68.478,46.755 U2.8
D-GND: C1.1 C2.1 C18.1 pad.MH@0,0 pad.MH@10,63 pad.MH@70,63 R3.1 U2.1
DIN: Q1.2 R13.2 U2.10 | length 5
  Top Layer w0.508: U2.10 66.134,48.405 66.134,49.258 66.432,49.555 68.577,49.555 68.874,49.853 68.874,50.682 R13.2
DIN#: LED4.4 R2.2 R15.2 | length 43.7
  Top Layer w0.508: LED4.4 36.691,36.657 36.691,50.057 39.695,53.061 64.084,53.061 R2.2
DOUT1: LED4.2 LED5.4 | length 7.8
  Top Layer w0.508: LED5.4@28.367,27.5 28.367,28.991 cw(c29.683,28.991) 28.753,29.921 cw(c29.469,29.205) 29.469,30.218 31.878,30.218 ccw(c31.878,32.758) 33.674,30.962 LED4.2
DOUT2: LED5.2 LED6.4 | length 6.5
  Top Layer w0.508: LED5.2@31.667,22.5 31.667,17.063 ccw(c32.977,17.063) LED6.4
DOUT3: LED6.2 LED7.4 | length 6.9
  Top Layer w0.508: LED6.2 cw(c38.031,15.741) 38.564,16.274 40.71,14.129 ccw(c42.506,15.925) 42.506,13.385 42.98,13.385 ccw(c42.98,14.392) LED7.4
DOUT4: LED7.2 LED8.4 | length 7.5
  Top Layer w0.508: LED7.2 46.429,19.093 cw(c48.225,17.297) 48.225,19.837 49.8,19.837 ccw(c49.8,22.005) 51.333,20.472 ccw(c50.569,21.237) 51.65,21.237 LED8.4
DOUT5: LED8.2 LED9.4 | length 6.6
  Top Layer w0.508: LED9.4 cw(c47.896,33.74) 48.35,33.74 LED8.2
EN: C2.2 J3.6 R1.2 U2.3 | length 75.6
  Top Layer w0.305: R1.2 U2.3 74.828,46.109 ; J3.6 61.856,14.039 59.925,15.971 59.925,31.605 60.352,32.033 73.511,32.033 74.828,33.35 74.828,46.109 ; C2.2 78.74,49.987 78.207,49.454 78.207,46.109 77.727,45.629 75.308,45.629 74.828,46.109
GND: C3.1 C4.1 C5.1 C6.1 C7.1 C8.1 C9.1 C10.1 C11.1 C12.1 C14.1 C15.1 C16.1 C17.1 C22.1 C23.1 D1.1 J1.2 J3.2 J3.MP1 J3.MP2 LED4.3 LED5.3 LED6.3 LED7.3 LED8.3 LED9.3 pad.MH@80,0 R3.2 SW3.1 SW3.2 SW4.1 SW4.3 SW4.4 U2.38 U2.39 U2.40 U2.41 U2.42 U2.43 U2.44 U2.45 U2.46 U2.47 U3.1 | length 2.7
  Top Layer w0.508: C22.1 35.025,23.845 cw(c34.98,23.845) 35.012,23.813 35.037,23.813 35.35,23.5 SW3.2
IO0: J3.5 U2.25 | length 31.9
  Top Layer w0.381: U2.25 60.858,29.489 60.858,17.17 62.989,15.039 J3.5
IOT_BUT: C22.2 R9.2 SW3.3 SW3.4 U2.11 | length 58.8
  Top Layer w0.508: SW3.4 36.543,26.5 36.397,26.646 36.397,34.25 38.005,35.857 38.005,48.279 40.164,50.438 R9.2 64.096,50.375 64.477,49.994 64.477,48.4 U2.11
  Top Layer w0.635: SW3.4 SW3.3
NetF1_2: F1.2 FB1.2
NetQ1_3: Q1.3 R2.1 R14.2 R15.1
RXD: J3.4 U2.34 | length 19.9
  Top Layer w0.381: U2.34 72.288,17.356 73.605,16.039 J3.4
TXD: J3.3 U2.35 | length 17.8
  Top Layer w0.381: U2.35 73.558,18.11 74.629,17.039 75.629,17.039 75.997,17.039 J3.3
pads on no net: J1.3 J1.MH LED9.2 U2.4 U2.5 U2.6 U2.7 U2.9 U2.12 U2.13 U2.14 U2.15 U2.16 U2.17 U2.18 U2.19 U2.20 U2.21 U2.22 U2.23 U2.24 U2.26 U2.27 U2.28 U2.29 U2.30 U2.31 U2.32 U2.33 U2.36 U2.37

## Polygon pours and split planes (outlines as drawn)
D-GND on Top Layer "NONET_L-01_P-001" (solid, pour order 2): 79.057,48.987 79.057,58.688 79.016,58.73 78.771,59.039 78.355,59.528 77.889,60.062 77.412,60.609 77.081,60.953 76.47,61.59 75.922,62.134 75.012,62.99 74.631,63.313 74.19,63.688 73.553,64.211 72.985,64.646 72.495,65.022 71.829,65.481 71.163,65.94 70.874,66.118 70.17,66.553 69.577,66.904 68.369,67.568 67.641,67.921 66.914,68.274 65.976,68.672 65.425,68.906 65.082,69.032 64.394,69.283 63.906,69.462 63.133,69.701 62.823,69.797 62.36,69.94 61.999,70.032 61.577,70.14 60.793,70.34 60,70.5 20,70.5 17.443,69.88 14.575,68.906 12.732,68.102 10.213,66.789 8.837,65.94 6.863,64.53 5.605,63.514 4.399,62.436 3.367,61.42 2.179,60.14 0.896,58.619 0.146,57.671 -1.382,55.476 -2.224,54.137 -3.303,52.21 -3.845,51.166 -4.352,50.063 -4.821,48.987 -5,48.544 -5,0.544 -4.216,-0.783 -3.168,-2.374 -2.208,-3.683 -1.034,-5.133 0.216,-6.502 1.456,-7.733 2.203,-8.43 3.09,-9.187 3.983,-9.905 5.037,-10.697 10.058,-10.697 10.058,57.252 76.575,57.252 76.81,57.017 76.81,47.459 77.868,47.459 77.87,48.987
GND on Top Layer "NONET_L02_P-001" (solid, remove dead copper, pour order 1): -4.37,48.658 -4.37,0.658 -3.678,-0.487 -2.896,-1.718 -1.711,-3.338 -0.221,-5.119 2.263,-7.632 3.895,-9.051 5.282,-10.064 6.493,-10.902 7.827,-11.788 72.219,-11.588 75.602,-9.281 79.902,-5.372 83.26,-1.174 84.276,0.658 84.276,21.717 78.435,21.717 78.435,49.022 84.089,49.022 83.006,51.404 81.42,54.311 79.511,57.258 76.642,60.61 74.638,62.497 70.466,65.699 67.766,67.152 64.464,68.676 59.983,69.946 20.086,69.946 18.412,69.581 14.335,68.152 10.013,65.82 7.282,63.924 5.072,62.084 3.428,60.394 0.55,56.761 -1.131,54.425

## Other copper
Top Layer:
  rectangle net 3.3V: 10.338,3.238 13.751,9.677
  rectangle net 5VCC: 24.106,2.242 27.889,7.518
  rectangle net NetF1_2: 21.385,2.242 23.673,3.942
  rectangle net 3.3V: 10.338,7.188 15.628,12.929
  rectangle net 3.3V: 14.935,9.027 21.006,11.252
  rectangle net 5VCC: 18.966,11.608 24.511,14.186
  rectangle net 5VCC: 19.728,11.608 26.543,13.284
  region net 5VCC: 24.106,55.042 24.106,53.848 64.541,53.848 64.541,55.042
  rectangle net 3.3V: 75.648,47.459 76.581,52.705
  rectangle net 3.3V: 74.384,51.346 76.581,56.947
  rectangle net 3.3V: 66.484,52.819 74.828,53.365
  region net NetQ1_3: 65.227,54.902 65.227,53.565 68.384,53.565 68.384,54.902
  rectangle net 3.3V: 66.484,50.159 67.786,53.365
  rectangle net 3.3V: 65.239,50.159 67.786,50.883
  rectangle net DIN: 68.44,50.285 69.43,52.597
  rectangle net NetQ1_3: 65.227,51.321 65.989,54.508
  rectangle net 3.3V: 10.338,55.626 76.581,56.947
  rectangle net 3.3V: 10.338,7.188 15.697,56.947
  region net 5VCC: 54.813,40.037 43.246,40.037 43.246,38.031 54.813,38.031
  rectangle net 5VCC: 24.155,38.506 29.184,54.458
  rectangle net BUTTON: 29.105,-7.497 35.663,-5.698
  rectangle net GND: 67.544,38.605 71.752,42.813
  rectangle net 5VIN: 16.639,2.242 20.185,3.942
  rectangle net 5VIN: 16.639,-3.505 19.609,3.942
  region net 5VCC: 53.161,12.179 49.894,17.837 47.123,16.238 50.39,10.58
  region net 5VCC: 30.108,32.163 33.01,33.839 29.184,40.465 26.282,38.79
  region net 5VCC: 41.651,37.275 44.303,35.744 45.898,38.506 43.246,40.037
  rectangle net IOT_BUT: 34.708,26.1 37.25,26.9
  rectangle net IOT_BUT: 34.708,25.495 35.343,26.9
  rectangle net 5VCC: 24.206,20.18 28.901,23.25
  region net 5VCC: 54.813,12.294 24.106,12.294 24.106,7.061 54.813,7.061
  rectangle net 5VCC: 24.106,10.312 26.746,54.066
  rectangle net 5VCC: 52.759,10.369 54.813,40.037
  region net 5VCC: 54.813,30.01 51.15,30.01 51.15,26.75 54.813,26.75
  region net 5VCC: 37.354,10.533 38.705,12.873 35.982,14.445 34.631,12.105
  pour cut-out: 36.251,49.327 36.251,53.667 39.599,53.667 39.599,49.327
  pour cut-out: 11.039,3.238 11.039,-10.697 10.023,-10.697 10.023,3.238

## Silkscreen, mask and mechanical layers (free items; w line width, h text height)
Top Overlay:
  lines w0.127: 77.356,50.203 77.754,50.203 78.161,49.797 79.545,49.797 79.545,50.114
  text "IoT-Button-v2.1" at 19.976,64.386 h4
  text "IoT" at 36.388,27.484 h3.81
  text "SERIAL" at 75.69,11.588 h1.52 r90
  text "PROGRAMING" at 77.049,11.583 h1.52 r90
  text "POWER" at 17.106,-12.427 h3.81 r90
  text "INPUT" at 48.677,-12.427 h3.81 r90
Bottom Overlay:
  drawing of 3075 lines, arcs and shapes, not listed
  text "ZERO CARBON FOOTPRINT" at 26.427,46.666 h0.97
Deimensions:
  circle w0.254: c40,25 r10
  lines w0.254: 35.5,-12.5 38.5,-12.5 ; 35.5,-12.424 35.5,-10.424 38.5,-10.424 38.5,-12.424 ; 18.363,-10.516 24.363,-10.516 24.363,-6.444 18.363,-6.444 18.363,-10.516 ; 19.613,-12.416 23.113,-12.416 23.113,-10.516 19.613,-10.516 19.613,-12.416 ; 33.8,-10.424 33.8,-7.324 39.8,-7.324 39.8,-10.424 33.8,-10.424 ; 37,22 37,28 43,28 43,22 37,22 ; 38.5,25 cw(c40,25) 41.5,25 cw(c40,25) 38.5,25
Board Outline:
  lines w0.254: 35.5,-12.5 38.5,-12.5 ; 78.74,30.393 78.74,48.533 85,48.544 ccw(c47.9,33.591) 76.75,61.298 ccw(c53.67,39.132) 60,70.5 20,70.5 ccw(c26.33,39.132) 3.25,61.298 ccw(c32.1,33.591) -5,48.544 -5,0.544 ccw(c25.512,17.69) 7.805,-12.5 72.195,-12.5 ccw(c54.488,17.69) 85,0.544 85,30.41 78.74,30.399 ; -1,0 cw(c0,0) 1,0 cw(c0,0) -1,0 ; 9,63 ccw(c10,63) 11,63 ccw(c10,63) 9,63 ; 69,63 ccw(c70,63) 71,63 ccw(c70,63) 69,63 ; 79,0 cw(c80,0) 81,0 cw(c80,0) 79,0
Fabrication:
  drawing of 191 lines, arcs and shapes, not listed
  text "Layer" at 102.298,23.241 h1.52
  text "Name" at 112.71,23.241 h1.52
  text "Material" at 136.326,23.241 h1.52
  text "Thickness" at 158.164,23.241 h1.52
  text "Constant" at 174.67,23.241 h1.52
  text "Board Layer Stack" at 189.144,23.241 h1.52
  text "Top Overlay" at 112.71,20.193 h1.52
  text "Top Solder" at 112.71,17.145 h1.52
  text "Solder Resist" at 136.326,17.145 h1.52
  text "0.010mm" at 158.164,17.145 h1.52
  text "3.5" at 174.67,17.145 h1.52
  text "1" at 102.298,14.097 h1.52
  text "Top Layer" at 112.71,14.097 h1.52
  text "0.035mm" at 158.164,14.097 h1.52
  text "Dielectric 1" at 112.71,11.049 h1.52
  text "FR-4" at 136.326,11.049 h1.52
  text "1.100mm" at 158.164,11.049 h1.52
  text "4.8" at 174.67,11.049 h1.52
  text "2" at 102.298,8.001 h1.52
  text "Bottom Layer" at 112.71,8.001 h1.52
  text "0.035mm" at 158.164,8.001 h1.52
  text "Bottom Solder" at 112.71,4.953 h1.52
  text "Solder Resist" at 136.326,4.953 h1.52
  text "0.010mm" at 158.164,4.953 h1.52
  text "3.5" at 174.67,4.953 h1.52
  text "Bottom Overlay" at 112.71,1.905 h1.52
  text "Total board thickness:" at 102.298,-1.143 h1.52
  text "1.190mm" at 158.164,-1.143 h1.52
  text "Note:" at 100.692,-10.871 h5.08
  text "1.Top layer is only signal layer in PCB" at 100.827,-14.432 h5.08
  text "2. PCB thickness would be 1.2mm" at 100.692,-20.117 h5.08
Drill Drawing:
  circle w0.254: c103.308,46.567 r0.847
  lines w0.254: 102.461,38.523 102.885,38.523 103.308,38.1 103.731,38.523 104.155,38.523 103.731,38.947 104.155,39.37 103.731,39.37 103.308,39.793 102.885,39.37 102.461,39.37 102.885,38.947 102.461,38.523 ; 102.461,42.333 102.885,42.333 102.885,41.91 103.731,41.91 103.731,42.333 104.155,42.333 104.155,43.18 103.731,43.18 103.731,43.603 102.885,43.603 102.885,43.18 102.461,43.18 102.461,42.333 ; 102.461,51.223 104.155,51.223 103.308,49.53 102.461,51.223 ; 102.461,53.34 104.155,53.34 104.155,55.033 102.461,55.033 102.461,53.34
  lines w0.381: 100.943,36.957 442.019,36.957 ; 100.943,56.007 442.019,56.007 ; 114.935,33.147 114.935,59.817 ; 128.394,33.147 128.394,59.817 ; 156.325,33.147 156.325,59.817 ; 169.175,33.147 169.175,59.817 ; 187.813,33.147 187.813,59.817 ; 225.902,33.147 225.902,59.817 ; 240.884,33.147 240.884,59.817 ; 259.827,33.147 259.827,59.817 ; 289.283,33.147 289.283,59.817 ; 310.968,33.147 310.968,59.817 ; 344.842,33.147 344.842,59.817 ; 378.715,33.147 378.715,59.817 ; 406.393,33.147 406.393,59.817 ; 100.943,33.147 442.019,33.147 442.019,59.817 100.943,59.817 100.943,33.147
  text "Symbol" at 103.229,57.15 h1.83
  text "Count" at 116.078,57.15 h1.83
  text "Hole Size" at 129.537,57.15 h1.83
  text "Plated" at 157.468,57.15 h1.83
  text "Hole Type" at 170.318,57.15 h1.83
  text "Drill Layer Pair" at 188.956,57.15 h1.83
  text "Via/Pad" at 227.045,57.15 h1.83
  text "Pad Shape" at 242.027,57.15 h1.83
  text "Template" at 260.97,57.15 h1.83
  text "Description" at 290.426,57.15 h1.83
  text "Hole Tolerance (+)" at 312.111,57.15 h1.83
  text "Hole Tolerance (-)" at 345.985,57.15 h1.83
  text "Hole Length" at 379.858,57.15 h1.83
  text "Routed Path Length" at 407.536,57.15 h1.83
  text "1" at 116.078,53.34 h1.52
  text "2.100mm (82.68mil)" at 129.537,53.34 h1.52
  text "NPTH" at 157.468,53.34 h1.52
  text "Round" at 170.318,53.34 h1.52
  text "Top Layer - Bottom Layer" at 188.956,53.34 h1.52
  text "Pad" at 227.045,53.34 h1.52
  text "Rounded" at 242.027,53.34 h1.52
  text "c0hn210m10" at 260.97,53.34 h1.52
  text "-" at 379.858,53.34 h1.52
  text "-" at 407.536,53.34 h1.52
  text "2" at 116.078,49.53 h1.52
  text "1.100mm (43.31mil)" at 129.537,49.53 h1.52
  text "PTH" at 157.468,49.53 h1.52
  text "Round" at 170.318,49.53 h1.52
  text "Top Layer - Bottom Layer" at 188.956,49.53 h1.52
  text "Pad" at 227.045,49.53 h1.52
  text "Rounded" at 242.027,49.53 h1.52
  text "c180h110" at 260.97,49.53 h1.52
  text "-" at 379.858,49.53 h1.52
  text "-" at 407.536,49.53 h1.52
  text "2" at 116.078,45.72 h1.52
  text "1.300mm (51.18mil)" at 129.537,45.72 h1.52
  text "PTH" at 157.468,45.72 h1.52
  text "Round" at 170.318,45.72 h1.52
  text "Top Layer - Bottom Layer" at 188.956,45.72 h1.52
  text "Pad" at 227.045,45.72 h1.52
  text "Rounded" at 242.027,45.72 h1.52
  text "c210h130" at 260.97,45.72 h1.52
  text "-" at 379.858,45.72 h1.52
  text "-" at 407.536,45.72 h1.52
  text "3" at 116.078,41.91 h1.52
  text "1.000mm (39.37mil)" at 129.537,41.91 h1.52
  text "PTH" at 157.468,41.91 h1.52
  text "Slot" at 170.318,41.91 h1.52
  text "Top Layer - Bottom Layer" at 188.956,41.91 h1.52
  text "Pad" at 227.045,41.91 h1.52
  text "Rectangle" at 242.027,41.91 h1.52
  text "(Mixed)" at 260.97,41.91 h1.52
  text "2.200mm (86.61mil)" at 379.858,41.91 h1.52
  text "1.200mm (47.24mil)" at 407.536,41.91 h1.52
  text "4" at 116.078,38.1 h1.52
  text "2.000mm (78.74mil)" at 129.537,38.1 h1.52
  text "PTH" at 157.468,38.1 h1.52
  text "Round" at 170.318,38.1 h1.52
  text "Top Layer - Bottom Layer" at 188.956,38.1 h1.52
  text "Pad" at 227.045,38.1 h1.52
  text "Rounded" at 242.027,38.1 h1.52
  text "c260h200x0m270mx10" at 260.97,38.1 h1.52
  text "-" at 379.858,38.1 h1.52
  text "-" at 407.536,38.1 h1.52
  text "12 Total" at 116.078,34.29 h1.52
  text "Slot definitions :" at 103.229,30.608 h1.52
  text "Routed Path Length" at 129.459,30.608 h1.52
  text "= Calculated from tool start centre position to tool end centre position." at 157.467,30.608 h1.52
  text "Hole Length" at 129.459,28.068 h1.52